# Altium PCB PCB1.PcbDoc (part 2 of 2)
Units mil, origin at the board's own origin, x right, y up, seen from the top; angles counter-clockwise.
Board outline 2620 x 2515 mil, 2 copper layers (Top Layer, Bottom Layer); 69 components, 45 nets, 203 pads, 16 vias.
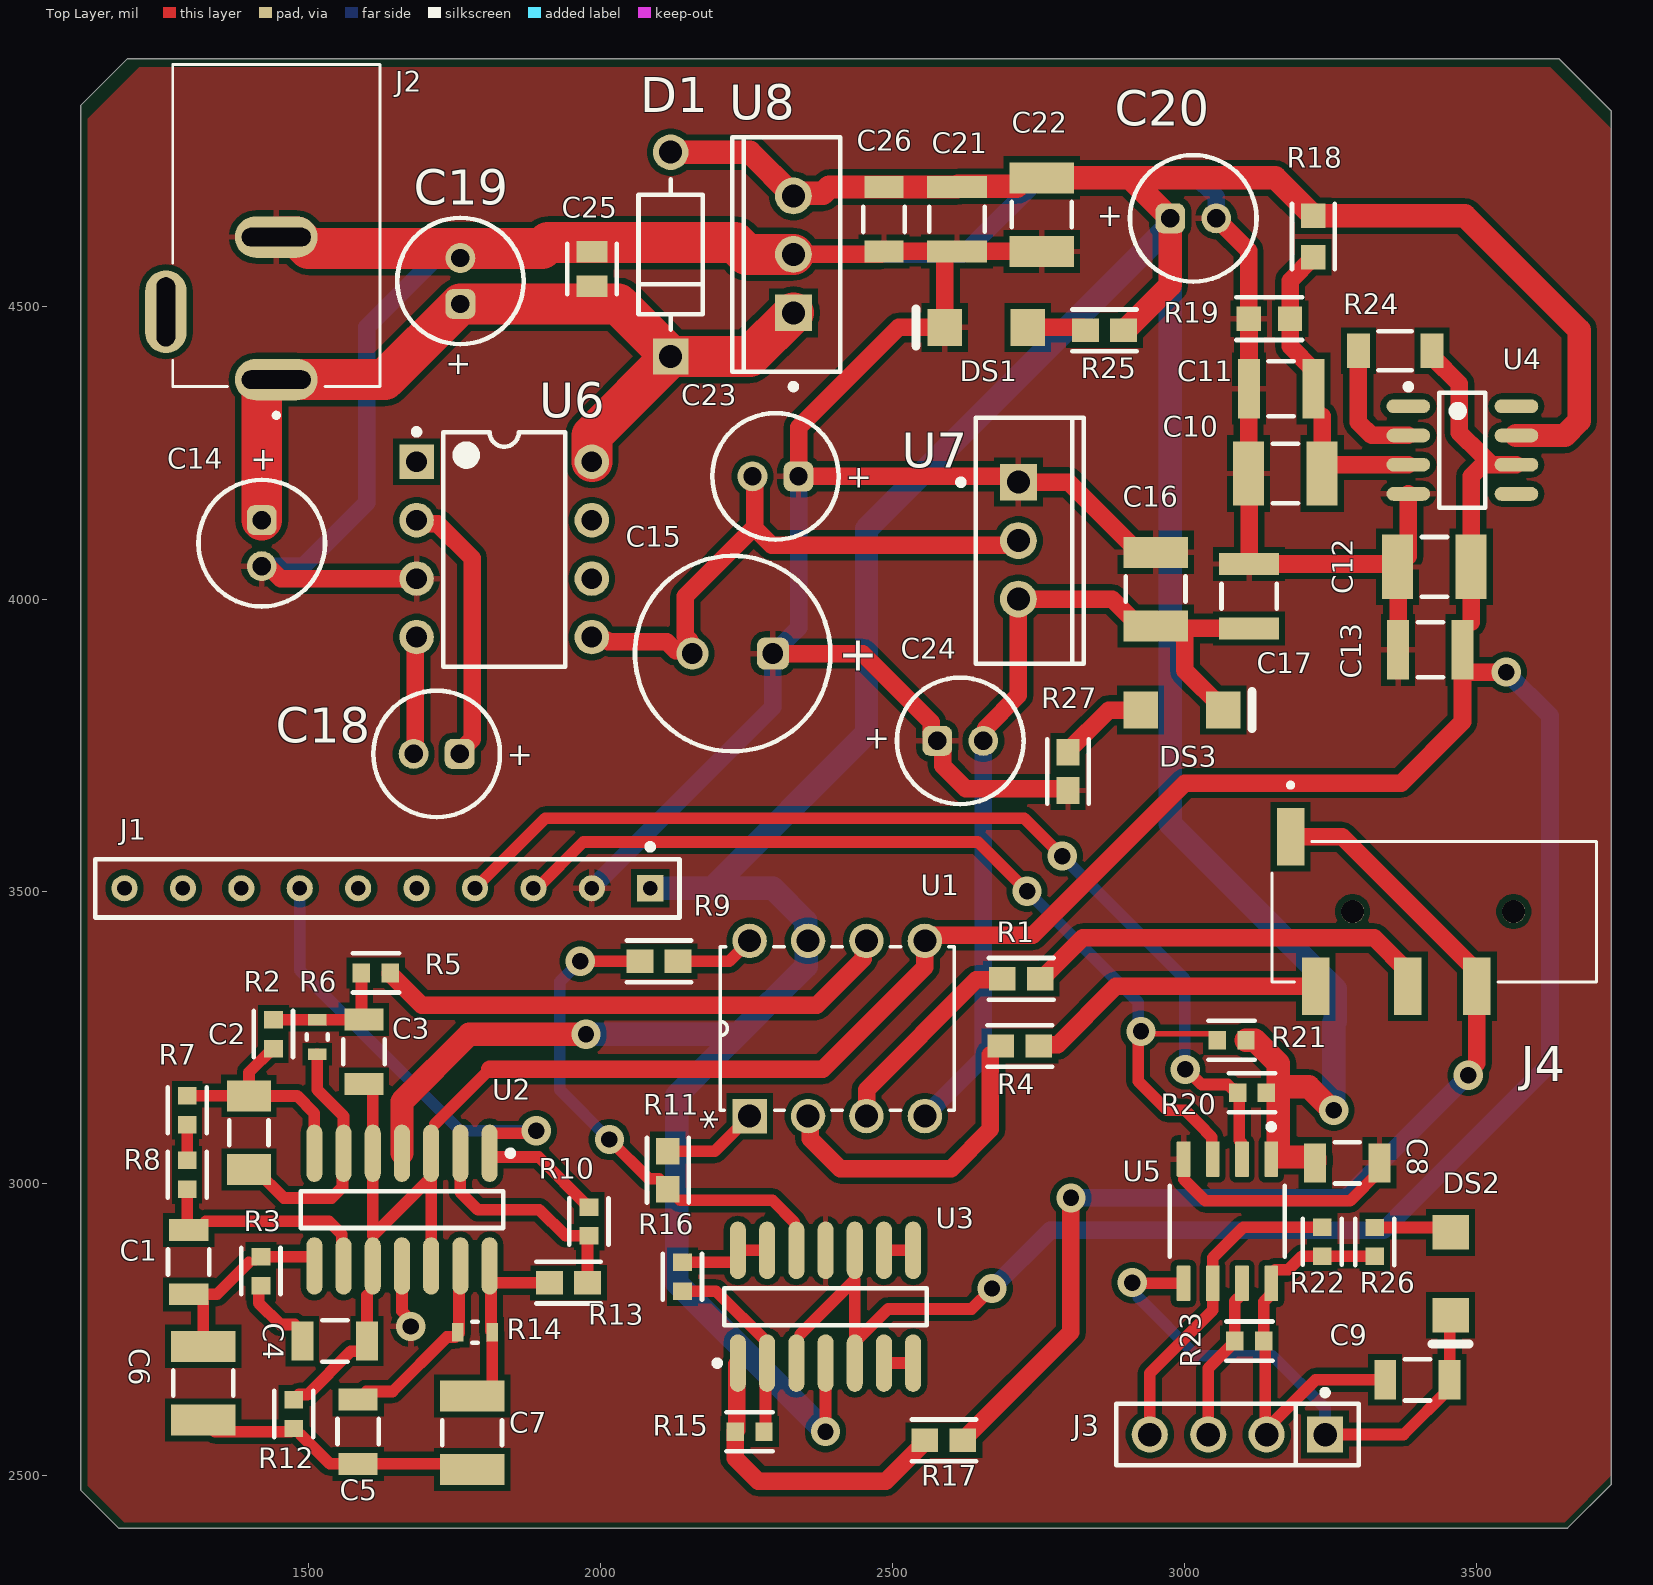
[diagram p0: Top Layer view]

## Via types
v1: diameter 50, hole 28, Top Layer to Bottom Layer, tented both sides, 15 vias
v2: diameter 50, hole 28, Top Layer to Bottom Layer, 1 vias

## Nets (pads, with @x,y where several pads share a name; then routed paths per layer and width w, separated by ;. In a path a pad name is that pad's centre, name@x,y a point inside that pad or via, vN(x,y) a via of type N, cw(c..) or ccw(c..) an arc to the next point about the centre after c; other vN are vias at no path point) (continued)
NetJ1_3: (continued)
  Top Layer w20: J1.3@1891.35,3505 1970.68,3584.32 2645.68,3584.32 v1(2730,3500) ; v1(2925,3260) 2920.33,3255.33 2920.33,3174.67 2970,3125 3000.73,3125 3035,3090.73 3035,3090 3046.04,3078.96 3046.04,3043.21 U5.3
  Bottom Layer w10: v1@2920,3265 v1(2925,3260)
  Bottom Layer w20: v1(2730,3500) 2920,3310 v1@2920,3265
NetJ1_4: J1.4 R20.2 U5.2 | length 1757.5
  Top Layer w20: J1.4 1905,3625 2725,3625 v1(2790,3560) ; v1(3000.61,3195) 3002.66,3195 3028.66,3169.01 3073.68,3169.01 3081.7,3160.99 3085.39,3160.99 3090.32,3156.06 R20.2 3093.11,3152.2 3093.11,3073.14 3096.04,3070.21 3096.04,3043.21 U5.2
  Bottom Layer w10: v1@3000,3195.61 v1(3000.61,3195)
  Bottom Layer w20: v1(2790,3560) 3000,3350 v1@3000,3195.61
NetJ1_7: J1.7 R10.1 U2.1 | length 978.5
  Top Layer w10: U2.1@1816.46,3045 U2.1 1810,3077.83 U2.1@1818.11,3085.94 ; v1@1885.94,3085.94 v1(1890,3090)
  Top Layer w20: U2.1@1816.46,3045 1894.37,3045 R10.1 ; U2.1@1818.11,3085.94 v1@1885.94,3085.94
  Bottom Layer w20: J1.7 1485,3365 1760,3090 v1(1890,3090)
NetJ3_3: J3.3 R23.2 U5.7 | length 282.8
  Top Layer w10: R23.2@3085.63,2728.94 R23.2 ; U5.7@3097.85,2810.1 U5.7
  Top Layer w20: J3.3 3040,2683.31 R23.2@3085.63,2728.94 ; R23.2 3085.63,2797.88 U5.7@3097.85,2810.1
NetJ3_4: J3.4 R22.2 U5.6 | length 556.1
  Top Layer w20: J3.4 2940,2675 3047.85,2782.85 3047.85,2872.85 3099.68,2924.68 R22.2
NetJ4_1: J4.1 J4.4 R17.1 | length 1881.1
  Top Layer w10: R17.1 2622.99,2560 R17.1@2622.99,2562.87 ; J4.4@3485,3322.24 J4.4 J4.4@3499.8,3362.64
  Top Layer w30: R17.1@2622.99,2562.87 2625.87,2562.87 2627.92,2564.92 2627.92,2567.8 2805,2744.88 v1(2805,2975) ; J4.1 3269.49,3592.95 J4.4@3499.8,3362.64 ; v1(3485,3185) 3485,3190.41 3500,3205.41 3500,3336.85 J4.4
  Bottom Layer w30: v1(2805,2975) 3275,2975 v1(3485,3185)
NetJ4_2: J4.2 R4.1 | length 516.4
  Top Layer w10: R4.1 R4.1@2752.18,3237.06
  Top Layer w30: R4.1@2752.18,3237.06 2782.06,3237.06 2882.05,3337.05 J4.2
NetJ4_3: J4.3 R1.1 | length 707.4
  Top Layer w10: R1.1 R1.1@2755.43,3350 ; J4.3 J4.3@3381.69,3362.52
  Top Layer w30: R1.1@2755.43,3350 2825.43,3420 3324.21,3420 J4.3@3381.69,3362.52
NetR1_2: R1.2 U1.3 | length 356.1
  Top Layer w30: U1.3 2455.18,3115.18 2455.18,3160.18 2643.04,3348.04 2685.48,3348.04 R1.2
NetR4_2: R4.2 U1.2 | length 549.7
  Top Layer w10: U1.2 U1.2@2358.64,3111.36 ; R4.2@2667.2,3220.08 2682.13,3235 R4.2
  Top Layer w30: U1.2@2358.64,3111.36 2358.64,3076.36 2410,3025 2600,3025 2667.2,3092.2 R4.2@2667.2,3220.08
NetR5_1: R5.1 U1.6 | length 898.6
  Top Layer w10: R5.1@1640,3358.94 R5.1
  Top Layer w30: R5.1@1640,3358.94 1693.94,3305 2370,3305 2449.45,3384.45 2449.45,3409.45 U1.6
NetR7_2: R7.2 R8.1 | length 60.9
  Top Layer w20: R8.1 R7.2
NetR9_1: R9.1 R11.2 U3.12 | length 888.2
  Top Layer w10: R11.2@2100.08,3007.8 2115,2992.87 2115,2987.13 2129.92,2972.2 2134.36,2972.2 2135.78,2970.78 ; R11.2@2117.16,3002.01 R11.2@2117.16,3004.88 ; U3.12@2331.64,2933.36 2331.64,2888.57 U3.12
  Top Layer w20: v1(1965,3380) R9.1 ; v1(2015,3075) 2082.2,3007.8 R11.2@2100.08,3007.8 ; 2135.78,2970.78 2294.22,2970.78 U3.12@2331.64,2933.36
  Bottom Layer w20: v1(1965,3380) 1930,3345 1930,3160 v1(2015,3075)
NetR9_2: R9.2 U1.8 | length 136.9
  Top Layer w20: R9.2 2220,3380 U1.8
NetR10_2: R10.2 R13.1 U2.2 | length 398.5
  Top Layer w10: R10.2@1977.56,2907.56 R10.2
  Top Layer w20: U2.2 1760,2985 1790,2955 1895,2955 1940,2910 R10.2 ; R13.1 R10.2@1977.56,2907.56
NetR11_1: R11.1 U1.1 | length 192.9
  Top Layer w10: U1.1@2235.12,3134.88 U1.1
  Top Layer w20: R11.1 2195.12,3055.12 U1.1
NetR15_1: R15.1 R17.2 U3.1 | length 539.7
  Top Layer w10: R15.1 R15.1@2232.66,2577.34 ; U3.1@2232.66,2689.95 U3.1 ; R17.2@2555,2557.13 R17.2
  Top Layer w30: R15.1 2230.32,2529.68 2270,2490 2487.87,2490 2547.2,2549.33 2547.2,2555.08 2549.25,2557.13 R17.2@2555,2557.13 ; R15.1@2232.66,2577.34 U3.1@2232.66,2689.95
NetR15_2: R15.2 R16.1 U3.2 | length 336.2
  Top Layer w10: R15.2 R15.2@2282.34,2577.66 ; U3.2@2282.34,2689.64 U3.2 U3.2@2285,2727.73
  Top Layer w20: R16.1 2197.41,2815.32 U3.2@2285,2727.73 ; R15.2@2282.34,2577.66 U3.2@2282.34,2689.64
NetR16_2: R16.2 U3.13 U3.14 | length 160.8
  Top Layer w10: U3.14@2226.89,2864.68 2235,2872.8 U3.14
  Top Layer w20: R16.2 U3.14@2226.89,2864.68 ; U3.14 U3.13
NetR24_1: R24.1 U4.2 | length 217
  Top Layer w30: R24.1 3297.01,4302.99 3320,4280 U4.2
NetU3_6: U3.6 U3.7 | length 50
  Top Layer w20: U3.6 U3.7
NetU3_8: U3.8 U3.9 | length 50
  Top Layer w20: U3.9 U3.8
pads on no net: J1.5 J1.6 J1.8 J1.9 J1.10 J2.3 J4. U4.1 U4.5 U4.8 U6.1 U6.6 U6.7

## Polygon pours and split planes (outlines as drawn)
GND on Bottom Layer "GND_L02_P001" (solid, pour order 1): 1210,4910 1122.55,4822.55 1122.55,2497.45 1210,2410 3625,2410 3730,2515 3730,4805 3625,4910
GND on Top Layer "GND_L01_P000" (solid, pour order 0): 1210,4910 1122.55,4822.55 1122.55,2482.45 1185,2420 3650,2420 3730,2500 3730,4805 3625,4910

## Silkscreen, mask and mechanical layers (free items; w line width, h text height)
Bottom Overlay:
  text "Huynh Tan Dat / Nguyen Minh Quan / Nguyen Hoang Khang / Nguyen Hong Minh" at 1790,2985 h60 r180
Mechanical 1:
  the board outline again, w4

## Text inside footprints (layer, text, board x,y; h text height)
C14: Top Overlay "+" at 1439.68,4215.71 h39.37 r90
C15: Top Overlay "+" at 2407.07,3877.16 h59.06
C18: Top Overlay "+" at 1839.45,3715.32 h39.37
C19: Top Overlay "+" at 1740.32,4424.29 h39.37 r270
C20: Top Overlay "+" at 2894.29,4671.35 h39.37 r180
C23: Top Overlay "+" at 2419.45,4190.31 h39.37
C24: Top Overlay "+" at 2495.55,3777 h39.37 r180
U1: Top 3D Body "*" at 2220.82,3091.83 h50.03 r90; Top Overlay "*" at 2220.7,3091.71 h50.05 r90